# Altium PCB Sound_Sensor_v3.2.PcbDoc (part 1 of 3)
Units mil, origin at the board's own origin, x right, y up, seen from the top; angles counter-clockwise.
Board outline 2755.7 x 2687.13 mil, 2 copper layers (Top Layer, Bottom Layer), stack 57 mil thick; 77 components, 57 nets, 290 pads, 84 vias.
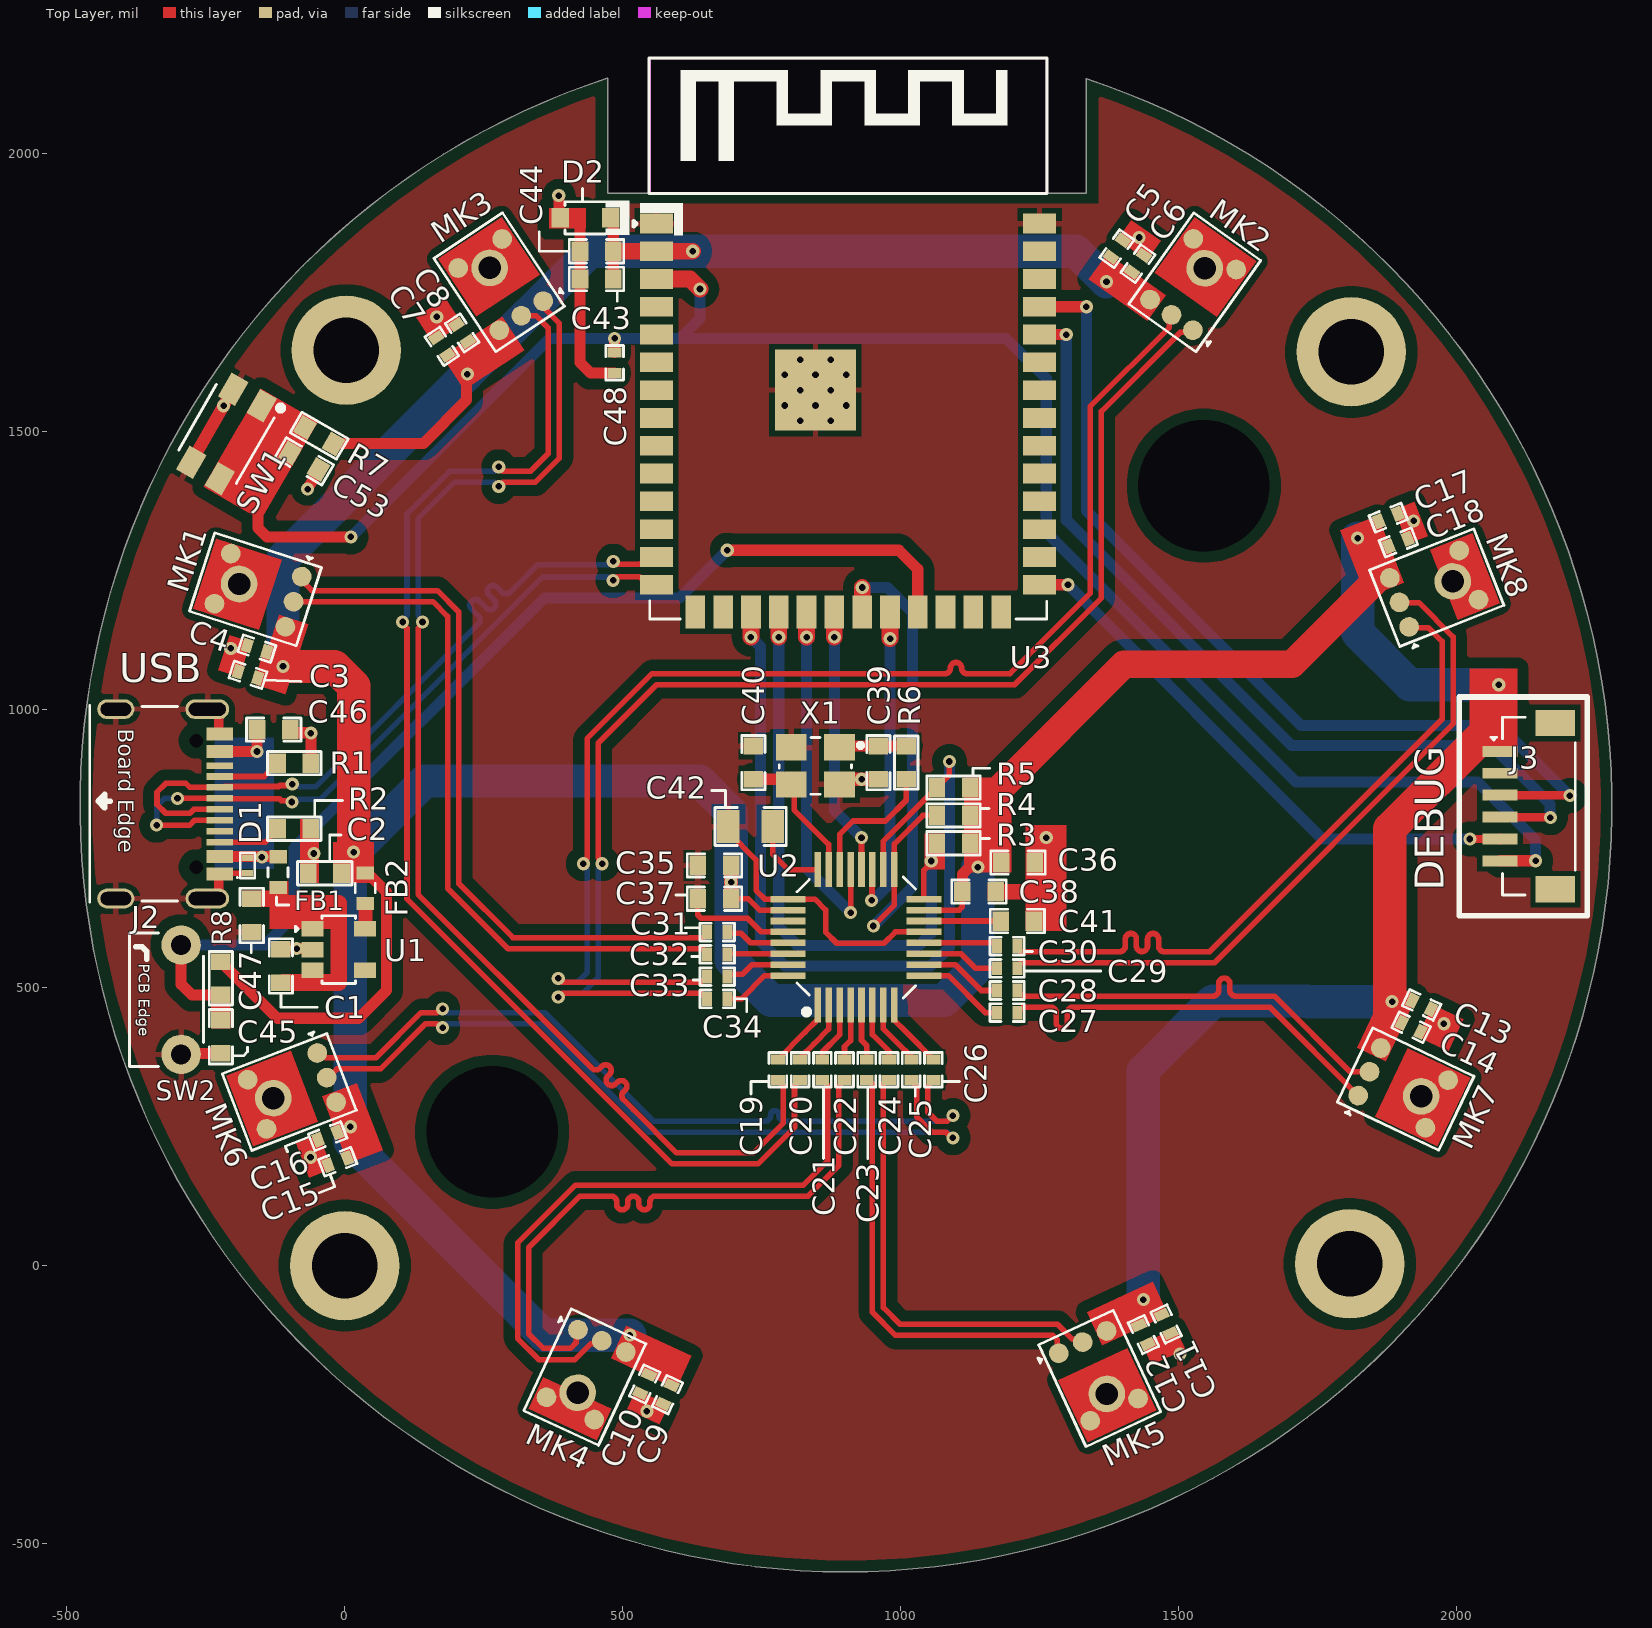
[diagram p0: Top Layer view]
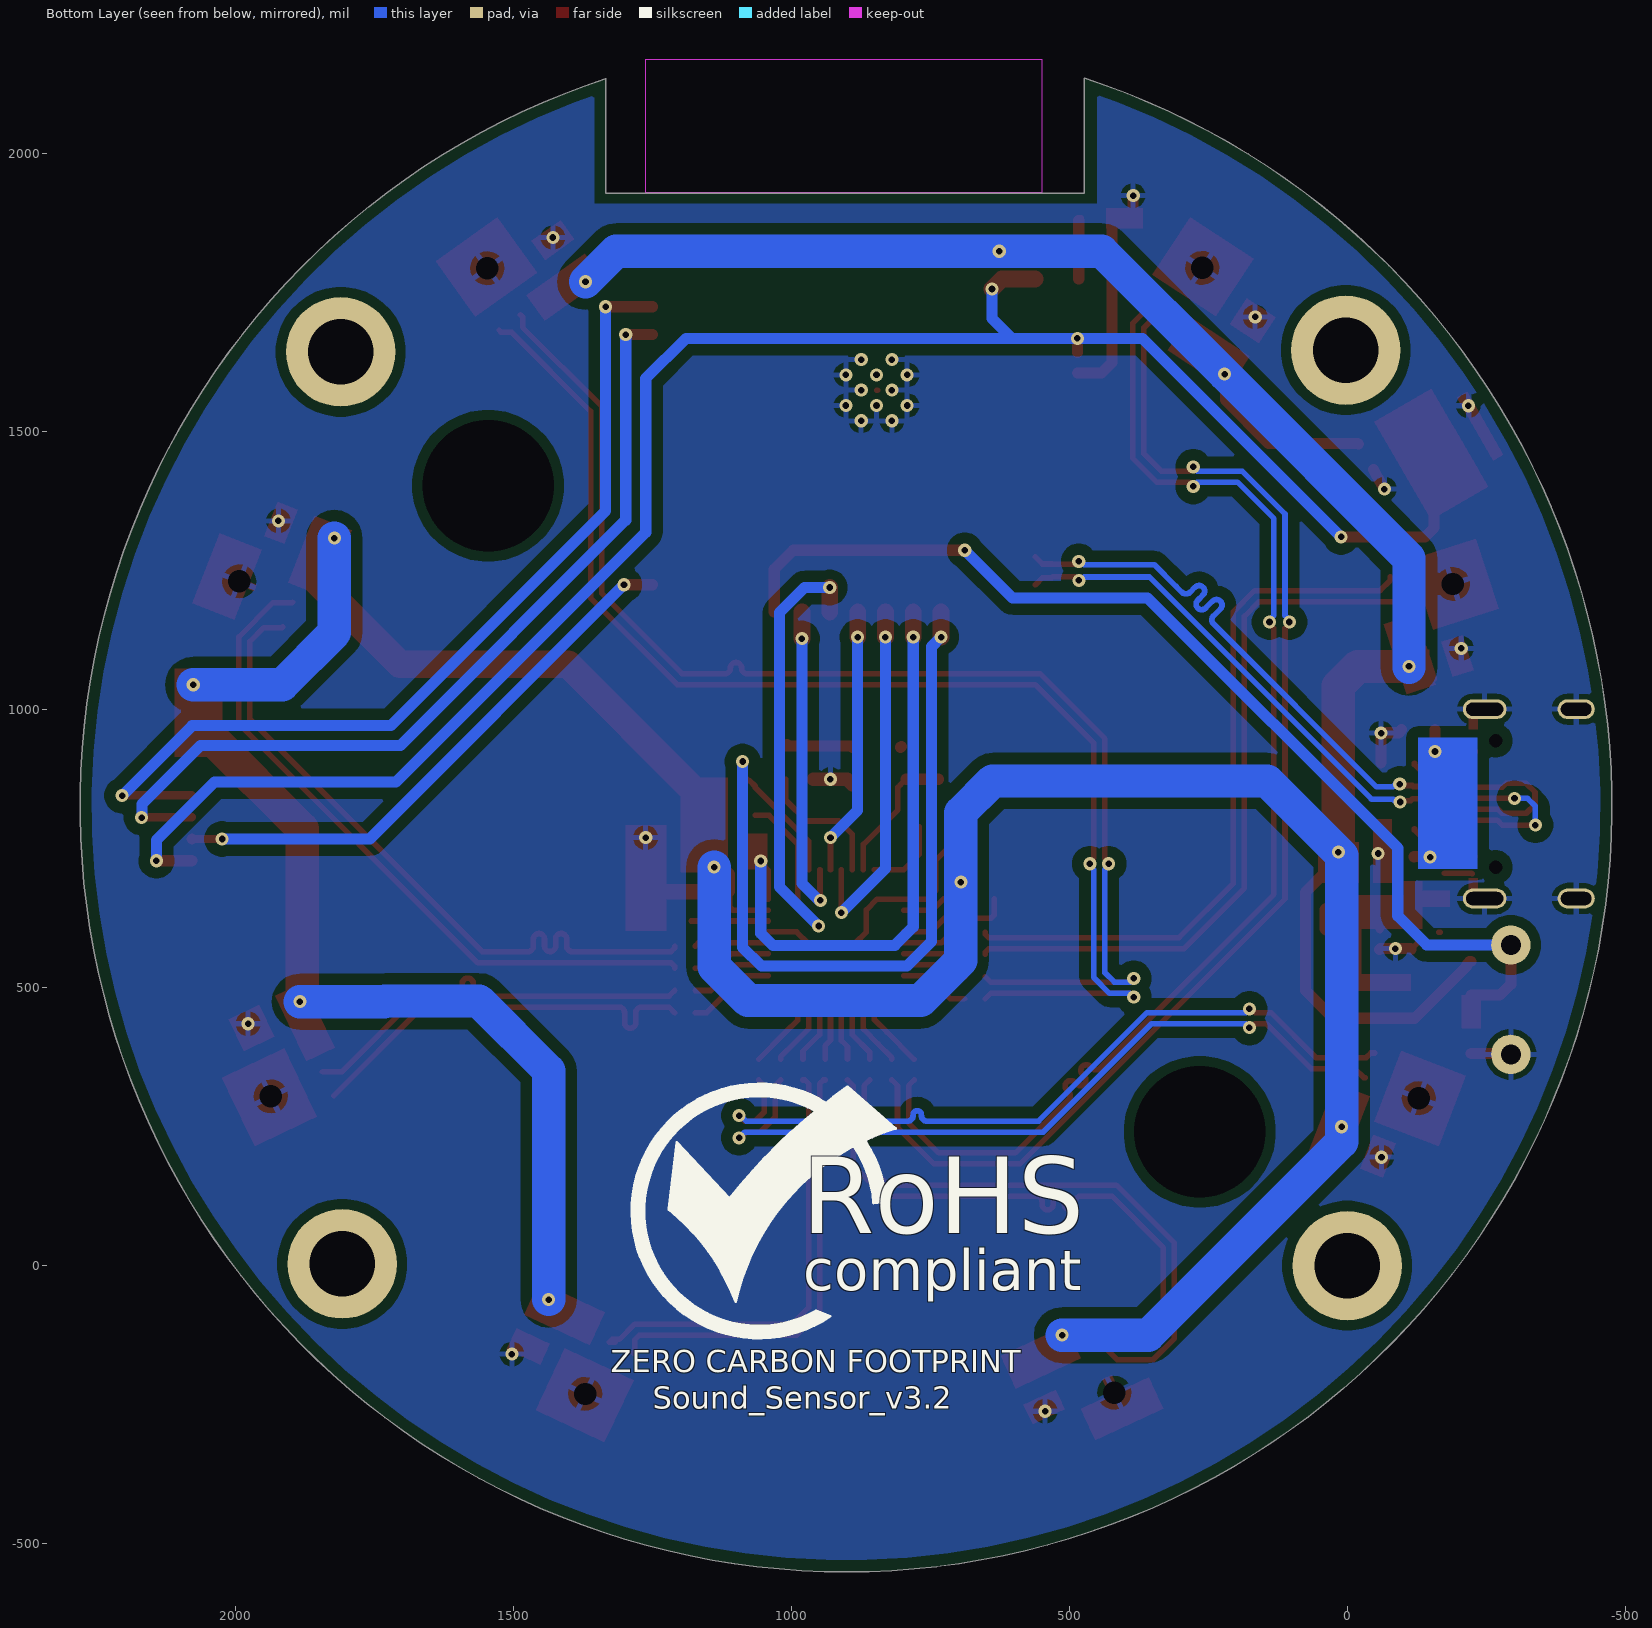
[diagram p1: Bottom Layer view, seen from below]

## Layer stack, top to bottom
Top Solder: solder mask 3, Solder Resist, Dk 3.5
Top Layer: signal copper 10
Dielectric 1: dielectric 37, FR-4, Dk 4.8
Bottom Layer: signal copper 10
Bottom Solder: solder mask 3, Solder Resist, Dk 3.5

## Board outline
471.79,2136.24 ccw(c901.69,827.06) 1334.24,2135.36 1334,2135.36 1334,1929.44 472.75,1929.44 472.75,2136.24

## Design rules (kind name [scope] priority, off if disabled: settings)
Clearance Clearance_TOP [OnLayer('Top Layer')] p1: gap=10 ignorepadtopadclearanceinfootprint=FALSE except(5: Arc-Arc Arc-Track Arc-SMDPad Track-Track Track-SMDPad SMDPad-SMDPad SMDPad-THPad SMDPad-Hole; 20: Arc-Fill Arc-Poly Arc-Region Track-Fill Track-Poly Track-Region THPad-Fill THPad-Poly THPad-Region Via-Fill Via-Poly Via-Region Fill-Fill Fill-Poly Fill-Region Poly-Poly Poly-Region Region-Region)
Clearance Clearance_BOT [OnLayer('Bottom Layer')] p2: gap=10 ignorepadtopadclearanceinfootprint=FALSE except(5: Arc-Arc Arc-Track Arc-SMDPad Track-Track Track-SMDPad SMDPad-SMDPad SMDPad-THPad SMDPad-Fill SMDPad-Poly SMDPad-Region SMDPad-Hole; 18: THPad-Fill THPad-Poly THPad-Region; 20: Arc-Fill Arc-Poly Arc-Region Track-Fill Track-Poly Track-Region Via-Fill Via-Poly Via-Region Fill-Fill Fill-Poly Fill-Region Poly-Poly Poly-Region Region-Region)
ComponentClearance [All] p1: gap=0 collisioncheckmode=3 verticalgap=0 showdistances=FALSE
DiffPairsRouting DiffPairsRouting_1 [InDifferentialPairClass('USB_Lines')] p1: maxlimit=12 minlimit=12 mostfreqgap=12 toplayer_minwidth=10 toplayer_maxwidth=10 toplayer_prefwidth=10 bottomlayer_minwidth=10 bottomlayer_maxwidth=10 bottomlayer_prefwidth=10 impedanceprofiledriven=TRUE impedanceprofileid={CC3068ED-7670-4747-8044-4FC642AA30B4} impedanceprofilevalue=90.000000 maxuncoupledlength=551
DiffPairsRouting [InDifferentialPairClass('All Differential Pairs')] p2: maxlimit=10 minlimit=10 mostfreqgap=10 toplayer_minwidth=10 toplayer_maxwidth=10 toplayer_prefwidth=10 bottomlayer_minwidth=10 bottomlayer_maxwidth=10 bottomlayer_prefwidth=10 impedanceprofiledriven=TRUE impedanceprofileid={4D369393-52E4-4E5C-B60A-CF207B47102A} impedanceprofilevalue=80.000000 maxuncoupledlength=500
HoleSize [All] p1: absolutevalues=TRUE maxlimit=500 minlimit=1 maxpercent=80.000 minpercent=20.000
MatchedLengths "Schematic Matched Net Lengths_2" [InNetClass('USB')] p1: tolerance=20 checknetsindiffpair=TRUE checkdiffpairvsdiffpair=FALSE checkxsignals=FALSE checkothers=FALSE
MatchedLengths "Schematic Matched Net Lengths" [InNetClass('OUT1')] p2: tolerance=20 checknetsindiffpair=TRUE checkdiffpairvsdiffpair=FALSE checkxsignals=FALSE checkothers=FALSE
MaxMinImpedance "Schematic Impedance Constraint_2" [InNetClass('USB')] p1: minimum=85.00 maximum=95.00
MaxMinImpedance "Schematic Impedance Constraint" [InNetClass('OUT1')] p2: minimum=85.00 maximum=95.00
MinimumSolderMaskSliver [All] p1: minsoldermaskwidth=0
PolygonConnect [All] p1: connectstyle=Relief reliefconductorwidth=10 reliefentries=4 polygonreliefangle="90 Angle" airgapwidth=10
RoutingVias [All] p1: holewidth=11.81 width=23.62 viastyle="Through Hole" minholewidth=11.81 minwidth=23.62 maxholewidth=11.81 maxwidth=23.62
SilkToSilkClearance [All] p1: silktosilkclearance=0
SilkToSolderMaskClearance [IsPad] p1: minsilkscreentomaskgap=0 clearancetoexposedcopper=TRUE
SolderMaskExpansion [All] p1: expansion=4 istentingtop=FALSE
Width [All] p1: maxlimit=100 minlimit=5 preferedwidth=10 toplayer_maxwidth=60 minimp=50.000000 maximp=50.000000 favimp=50.000000
24 further rules are at their usual default settings.

## Classes and differential pairs
differential pair class USB_Lines: USB.USB
net class USB: USB.USB_N USB.USB_P
differential pair class OUT8_Lines: MIC_OUTS.OUT8
differential pair class OUT7_Lines: MIC_OUTS.OUT7
differential pair class OUT6_Lines: MIC_OUTS.OUT6
differential pair class OUT5_Lines: MIC_OUTS.OUT5
differential pair class OUT4_Lines: MIC_OUTS.OUT4
differential pair class OUT3_Lines: MIC_OUTS.OUT3
differential pair class OUT2_Lines: MIC_OUTS.OUT2
differential pair class OUT1_Lines: MIC_OUTS.OUT1
net class OUT8: MIC_OUTS.OUT8_N MIC_OUTS.OUT8_P
net class OUT7: MIC_OUTS.OUT7_N MIC_OUTS.OUT7_P
net class OUT6: MIC_OUTS.OUT6_N MIC_OUTS.OUT6_P
net class OUT5: MIC_OUTS.OUT5_N MIC_OUTS.OUT5_P
net class OUT4: MIC_OUTS.OUT4_N MIC_OUTS.OUT4_P
net class OUT3: MIC_OUTS.OUT3_N MIC_OUTS.OUT3_P
net class OUT2: MIC_OUTS.OUT2_N MIC_OUTS.OUT2_P
net class OUT1: MIC_OUTS.OUT1_N MIC_OUTS.OUT1_P
component class U_Sensor_Sheet: C3 C4 C5 C6 C7 C8 C9 C10 C11 C12 C13 C14 C15 C16 C17 C18 MK1 MK2 MK3 MK4 MK5 MK6 MK7 MK8
component class U_Power_Section: C1 C2 FB2 U1
component class U_Controller_Sheet: C43 C44 C45 C48 C53 D2 R7 R8 SW1 SW2 U3
component class U_Connector_Sheet: C46 C47 D1 FB1 J2 J3 R1 R2
component class U_ADC_Section: 3 C19 C20 C21 C22 C23 C24 C25 C26 C27 C28 C29 C30 C31 C32 C33 C34 C35 C36 C37 C38 C39 c40 C41 C42 R3 R4 R5 R6 U2 X1
differential pair USB.USB: +USB.USB_P -USB.USB_N
differential pair MIC_OUTS.OUT8: +MIC_OUTS.OUT8_P -MIC_OUTS.OUT8_N
differential pair MIC_OUTS.OUT7: +MIC_OUTS.OUT7_P -MIC_OUTS.OUT7_N
differential pair MIC_OUTS.OUT6: +MIC_OUTS.OUT6_P -MIC_OUTS.OUT6_N
differential pair MIC_OUTS.OUT5: +MIC_OUTS.OUT5_P -MIC_OUTS.OUT5_N
differential pair MIC_OUTS.OUT4: +MIC_OUTS.OUT4_P -MIC_OUTS.OUT4_N
differential pair MIC_OUTS.OUT3: +MIC_OUTS.OUT3_P -MIC_OUTS.OUT3_N
differential pair MIC_OUTS.OUT2: +MIC_OUTS.OUT2_P -MIC_OUTS.OUT2_N
differential pair MIC_OUTS.OUT1: +MIC_OUTS.OUT1_P -MIC_OUTS.OUT1_N

## Components (designator, comment, footprint, x,y, rotation, side; value= is the part's Value field where it differs from the comment)
C1 "1uF" Cap-0603 -115,539 r90 top
C2 "4.7uF" Cap-0603 -36,706 r180 top
C3 "1uF" Cap-0402 -174.1,1063 r162 top
C4 "220pF" "Cap 0402" -158.1,1110 r162 top
C5 "1uF" Cap-0402 1388.94,1829.63 r54.5 top
C6 "220pF" "Cap 0402" 1426.94,1802.63 r54.5 top
C7 "1uF" Cap-0402 174.53,1653.94 r123.5 top
C8 "220pF" "Cap 0402" 211.13,1677.9 r123.5 top
C9 "1uF" Cap-0402 580.53,-231.94 r245 top
C10 "220pF" "Cap 0402" 539.53,-212.94 r245 top
C11 "1uF" Cap-0402 1477.63,-104.95 r295 top
C12 "220pF" "Cap 0402" 1436.63,-123.95 r295 top
C13 "1uF" Cap-0402 1937.22,469.06 r334.5 top
C14 "220pF" "Cap 0402" 1918.4,429.02 r334.5 top
C15 "1uF" Cap-0402 -12.73,187.1 r201 top
C16 "220pF" "Cap 0402" -30.73,233.1 r201 top
C17 "1uF" Cap-0402 1877.16,1345.79 r21.5 top
C18 "220pF" "Cap 0402" 1895.26,1301 r21.5 top
C19 "100nF" Cap-0402 779,352.5 r90 top
C20 "100nF" Cap-0402 819,352.5 r90 top
C21 "100nF" Cap-0402 859,352.5 r90 top
C22 "100nF" Cap-0402 899,352.5 r90 top
C23 "100nF" Cap-0402 939,352.5 r90 top
C24 "100nF" Cap-0402 979,352.5 r90 top
C25 "100nF" Cap-0402 1019,352.5 r90 top
C26 "100nF" Cap-0402 1059,352.5 r90 top
C27 "100nF" Cap-0402 1191.5,455 r180 top
C28 "100nF" Cap-0402 1191.5,495 r180 top
C29 "100nF" Cap-0402 1191.5,535 r180 top
C30 "100nF" Cap-0402 1191.5,575 r180 top
C31 "100nF" Cap-0402 670,600 r0 top
C32 "100nF" Cap-0402 670,560 r0 top
C33 "100nF" Cap-0402 670,520 r0 top
C34 "100nF" Cap-0402 670,480 r0 top
C35 "1uF" Cap-0603 665,720 r180 top
C36 "1uF" Cap-0603 1211,725 r0 top
C37 "100nF" Cap-0603 665,660 r180 top
C38 "100nF" Cap-0603 1141,673 r0 top
C39 "20pF" Cap-0603 960,905 r90 top
C40 "20pF" Cap-0603 735,905 r270 top
C41 "100nF" Cap-0603 1210,620 r0 top
C42 "220nF" Cap-0805 730,790 r0 top
C43 "1uF" Cap-0603 453,1775 r180 top
C44 "100nF" Cap-0603 453,1825 r180 top
C45 "100nF" Cap-0603 -223,412 r90 top
C46 "1uF" Cap-0603 -127.95,964.25 r0 top
C47 "1uF" Cap-0603 -167.32,629.92 r270 top
C48 "1uF" Cap-0402 485.5,1624.22 r90 top
C53 "100nF" Cap-0603 -73,1447 r330 top
D1 "TPD1E10B06DPYR" X1SON -175,720 r90 top
D2 "UDD32C03L01" SOD-323 433,1885 r180 top
FB1 "BLM18SG121TN1D" "IND-0603 (1608 Metric)" -120,708 r270 top
FB2 "BLM18SG121TN1D" "IND-0603 (1608 Metric)" 37,679 r90 top
J2 "TYPE-C-31-M-12" TYPE-C-31-M-12_ -224.87,956.76 r270 top locked
J3 "Voltlink Target" "Voltlink Target" 2127.98,826.77 r270 top locked
MK1 "SPM0687LR5H-1" SPM0687LR5H-1 -155.91,1215.24 r252 top
MK2 "SPM0687LR5H-1" SPM0687LR5H-1 1526.16,1765 r144.5 top
MK3 "SPM0687LR5H-1" SPM0687LR5H-1 280.51,1764.96 r213.5 top
MK4 "SPM0687LR5H-1" SPM0687LR5H-1 434.13,-196.05 r335 top
MK5 "SPM0687LR5H-1" SPM0687LR5H-1 1355.74,-198.25 r25 top
MK6 "SPM0687LR5H-1" SPM0687LR5H-1 -95.16,314.29 r291 top
MK7 "SPM0687LR5H-1" SPM0687LR5H-1 1903.94,319.92 r64.5 top
MK8 "SPM0687LR5H-1" SPM0687LR5H-1 1959.8,1217.8 r111.5 top
R1 "5.1K" Res-0603 -91,904 r180 top
R2 "5.1K" Res-0603 -91,786 r180 top
R3 "100K" RES-0603 1095,760 r0 top
R4 "100K" RES-0603 1095,810 r0 top
R5 "100K" RES-0603 1095,860 r0 top
R6 "0R" Res-0603 1010,905 r90 top
R7 "10K" Res-0603 -46,1493 r150 top
R8 "10K" Res-0603 -223,517 r90 top
SW1 "TS-1185EC-C-D-B" TS-1185EC-C-D-B -212.86,1496.21 r240 top
SW2 "K2-1101DF-C4DW-01" K2-1101DF-C4DW-01 -294.33,478.44 r270 top
U1 "XC6220B331MR-G" SOT-25-5 -10.75,568.58 r0 top locked
U2 "ADS131M08IPBSR" 32TQFP 919.68,590.55 r90 top locked
U3 "ESP32-S3-WROOM-1-N8R2" "41-SMD Module" 905.51,1525.39 r0 top locked
X1 "3TJ481920NYLBC" 3TJ481920NYLBC 846.69,899.06 r180 top

## Footprints (in the part's own frame and the unit in brackets; to place one, negate y for a bottom-side part, rotate by r counter-clockwise, add the part's x,y. Pads: shape width x height; smd on the part's side, far side on the other; paste and mask are expansions set on the pad)
3TJ481920NYLBC [mm]
  rect 1.4x1.2 smd mask+0.07: 1(-1.1,-0.85) 2(1.1,-0.85) 3(1.1,0.85) 4(-1.1,0.85)
  silkscreen extent -2.14,-1.3 1.65,1.3, body extent -1.6,-1.25 1.6,1.25, height 0.91
32TQFP [mm]
  rect 1.6x0.3 smd: 1(-3.1,1.75) 2(-3.1,1.25) 3(-3.1,0.75) 4(-3.1,0.25) 5(-3.1,-0.25) 6(-3.1,-0.75) 7(-3.1,-1.25) 8(-3.1,-1.75) 17(3.1,-1.75) 18(3.1,-1.25) 19(3.1,-0.75) 20(3.1,-0.25) 21(3.1,0.25) 22(3.1,0.75) 23(3.1,1.25) 24(3.1,1.75)
  rect 0.3x1.6 smd: 9(-1.75,-3.1) 10(-1.25,-3.1) 11(-0.75,-3.1) 12(-0.25,-3.1) 13(0.25,-3.1) 14(0.75,-3.1) 15(1.25,-3.1) 16(1.75,-3.1) 25(1.75,3.1) 26(1.25,3.1) 27(0.75,3.1) 28(0.25,3.1) 29(-0.25,3.1) 30(-0.75,3.1) 31(-1.25,3.1) 32(-1.75,3.1)
  silkscreen extent -3.53,-2.72 2.77,2.69, body extent -3.5,-3.51 3.5,3.49, height 1.25
"41-SMD Module" [mm]
  rect 1.5x0.9 smd: 1(-8.75,8.88) 2(-8.75,7.61) 3(-8.75,6.34) 4(-8.75,5.07) 5(-8.75,3.8) 6(-8.75,2.53) 7(-8.75,1.26) 8(-8.75,-0.01) 9(-8.75,-1.28) 10(-8.75,-2.55) 11(-8.75,-3.82) 12(-8.75,-5.09) 13(-8.75,-6.36) 14(-8.75,-7.63) 27(8.75,-7.63) 28(8.75,-6.36) 29(8.75,-5.09) 30(8.75,-3.82) 31(8.75,-2.55) 32(8.75,-1.28) 33(8.75,-0.01) 34(8.75,1.26) 35(8.75,2.53) 36(8.75,3.8) 37(8.75,5.07) 38(8.75,6.34) 39(8.75,7.61) 40(8.75,8.88)
  rect 0.9x1.5 smd: 15(-6.98,-8.88) 16(-5.71,-8.88) 17(-4.44,-8.88) 18(-3.17,-8.88) 19(-1.9,-8.88) 20(-0.63,-8.88) 21(0.64,-8.88) 22(1.91,-8.88) 23(3.18,-8.88) 24(4.45,-8.88) 25(5.72,-8.88) 26(6.99,-8.88)
  rect 3.7x3.7 smd: 41(-1.5,1.26)
  Keep-Out Layer region: -9.042,10.287 9.042,10.287 9.042,16.383 -9.042,16.383
  silkscreen extent -9.8,-9.2 9.09,16.43, body extent -9.01,-9.14 9.01,16.37, height 3.16
"Cap 0402" [mil]
  rect 18x25 smd mask+2.36: 1(-18.5,0) 2(18.5,0)
  silkscreen extent -31,-16 31,16, body extent -20,-10 20,10, height 19
Cap-0402 [mil]
  rect 18x25 smd mask+2.36: 1(-18.5,0) 2(18.5,0)
  silkscreen extent -31,-16 31,16, body extent -20,-10 20,10, height 19
Cap-0603 [mil]
  rect 30x35 smd mask+2.36: 1(-30,0) 2(30,0)
  silkscreen extent -49,-21 49,21, body extent -32,-16 31,16, height 34
Cap-0805 [mil] "SMD 0805"
  rect 40x60 smd mask+2.76: 1(-40,0) 2(40,0)
  silkscreen extent -64,-34 64,34, body extent -39,-25 39,25, height 30
"IND-0603 (1608 Metric)" [mm] "0.063\" L x 0.032\" W (1.60mm x 0.80mm)"
  rect 0.6x0.8 smd: 1(-0.7,0) 2(0.7,0)
  silkscreen extent -0.2,-0.46 0.23,0.46, body extent -0.8,-0.4 0.8,0.4, height 0.78
K2-1101DF-C4DW-01 [mm]
  round 1.8 hole 0.92: 1(-2.5,0) 2(2.5,0)
  silkscreen extent -3.05,-2.36 3.05,1.02, body extent -3,-4.04 3,0.96, height 3.45
Res-0603 [mil]
  rect 30x35 smd: 1(-30,0) 2(30,0)
  silkscreen extent -48,-21 48,21, body extent -31,-17 31,17, height 18
RES-0603 [mil]
  rect 30x35 smd: 1(-30,0) 2(30,0)
  silkscreen extent -48,-21 48,21, body extent -31,-17 31,17, height 18
SOD-323 [mm]
  rect 0.8x0.9 smd mask+0.055: 1(-1.15,0) 2(1.15,0)
  silkscreen extent -2.01,-0.79 0.94,0.79, body extent -1.3,-0.67 1.3,0.67, height 1.1
SOT-25-5 [mm]
  rect 1x0.7 smd: 1(-1.2,0.95) 2(-1.2,0) 3(-1.2,-0.95) 4(1.2,-0.95) 5(1.2,0.95)
  silkscreen extent -1.98,-1.55 0.76,1.55, body extent -1.19,-1.5 1.21,1.5, height 1.1
SPM0687LR5H-1 [mm]
  round 0.9 smd: 1(-1.204,1.703) 2(-1.204,-1.703) 4(1.204,-1.703) 5(1.204,1.703) 6(0,1.703)
  round 1.676 / inner round 1.676 / far side round 0 hole 1.025: 3(0,-0.913)
  silkscreen extent -2.16,-2.69 1.88,2.44, body extent -1.88,-2.68 1.88,2.38, height 1.15
TS-1185EC-C-D-B [mm]
  rect 1.25x0.9 smd: 1(-1.925,0.75) 1(1.925,0.75) 2(-1.925,-0.75) 2(1.925,-0.75)
  silkscreen extent -2.39,-1.52 1.73,1.68, body extent -2.33,-1.5 2.32,1.5, height 2
TYPE-C-31-M-12_ [mm]
  rect 0.6x1.2 smd: A1/B12(0,0) A4/B9(0.8,0) B1/A12(6.4,0) B4/A9(5.6,0)
  rect 0.3x1.2 smd: A5(1.95,0) A6(2.95,0) A7(3.45,0) A8(4.45,0) B5(4.95,0) B6(3.95,0) B7(2.45,0) B8(1.45,0)
  round 0 hole 0.62 unplated: MH(0.31,-1.07) MH(6.09,-1.07)
  oval 0.9x2 hole 0.6 slot 1.7 at 90 deg: S1(7.525,-0.57) S4(-1.125,-0.57)
  oval 0.9x1.7 hole 0.6 slot 1.4 at 90 deg: S2(7.525,-4.75) S3(-1.125,-4.75)
  silkscreen extent -1.3,-5.94 7.7,-1.93, body extent -1.27,-7.32 7.67,0.58, height 3.31
"Voltlink Target" [mm]
  rect 0.5x1.6 smd: 1(-2.5,-1.262) 2(-1.5,-1.262) 3(-0.5,-1.262) 4(0.5,-1.262) 5(1.5,-1.262) 6(2.5,-1.262)
  rect 1.2x1.8 smd: MP1(-3.8,1.262) MP2(3.8,1.262)
  silkscreen extent -4.06,-1.68 4.06,2.17, body extent -4,-1.49 4,2.11, height 4.25
X1SON [mm] "TVS 6A@80/20µs 14V 6V 5.5V@(MAX)"
  rect 0.3x0.5 smd: 1(-0.35,0) 2(0.35,0)
  silkscreen extent -0.58,-0.33 0.58,0.47, body extent -0.5,-0.3 0.5,0.3, height 0.45

## Part data
C1 C35 C36 C43 C46 C47: library part CC0603KRX5R8BB105, "CAP CER 1UF 25V X5R 0603", Case Code (Imperial)=0603, Case Code (Metric)=1608, Dielectric=X5R, LCSC Part Number=C14664, Manufacturer=Yageo, Max Operating Temperature=85°C, Min Operating Temperature=-55°C, Package Quantity=1, Supplier Part Number 1=311-1445-1-ND, Tolerance=10%, Voltage Rating=25V, Capacitance=1uF, Case/Package=0603, Category="Ceramic Capacitors", ComponentLink1Description=https://datasheet.ciiva.com/176/mlccorderingcode-176785.pdf?src-supplier=Digi-Key, ComponentLink1URL=https://datasheet.ciiva.com/176/mlccorderingcode-176785.pdf?src-supplier=Digi-Key, ComponentLink2Description=https://datasheet.ciiva.com/176/mlccorderingcode-176786.pdf?src-supplier=Digi-Key, ComponentLink2URL=https://datasheet.ciiva.com/176/mlccorderingcode-176786.pdf?src-supplier=Digi-Key, ComponentLink3Description=https://datasheet.ciiva.com/176/mlccorderingcode-176787.pdf?src-supplier=Digi-Key, ComponentLink3URL=https://datasheet.ciiva.com/176/mlccorderingcode-176787.pdf?src-supplier=Digi-Key, ComponentLink4Description=https://datasheet.ciiva.com/17436/upy-gphc-x5r-4v-to-50v-12-17436952.pdf?src-supplier=Avnet+Europe, ComponentLink4URL=https://datasheet.ciiva.com/17436/upy-gphc-x5r-4v-to-50v-12-17436952.pdf?src-supplier=Avnet+Europe, ComponentLink5Description=https://datasheet.ciiva.com/7978/1525783-7978171.pdf?src-supplier=Element14, ComponentLink5URL=https://datasheet.ciiva.com/7978/1525783-7978171.pdf?src-supplier=Element14, ComponentLink6Description=https://datasheet.ciiva.com/11586/upy-gphc-x5r-4v-to-50v-12-11586318.pdf?src-supplier=Avnet, ComponentLink6URL=https://datasheet.ciiva.com/11586/upy-gphc-x5r-4v-to-50v-12-11586318.pdf?src-supplier=Avnet, Construction=Flat, Depth=0.8mm, Halogen Free="Halogen Free", Height=0.8mm, Item Type=Capacitor, Lead Free="Lead Free", Length=1.6mm, Manufacturer Part Number=CC0603KRX5R8BB105, Mount="Surface Mount", Number of Pins=2, Packaging="Tape and Reel", Pricing 1="1=0.12000, 10=0.08400, 50=0.04760, 100=0.03940, 500=0.02764, 1000=0.02288 (USD)", Radiation Hardening=No, REACH SVHC="No SVHC", RoHS=Yes, RoHS Compliant=Yes, Series=CC, Stock 1=919939, Supplier 1=Digi-Key, Termination=SMD/SMT, Thickness=0.035inch, Voltage Rating (DC)=25V, Width=0.031inch
C2: library part CC0603KRX5R7BB475, "CAP CER 4.7UF 16V X5R 0603", Case Code (Imperial)=0603, Case Code (Metric)=1608, Dielectric=X5R, LCSC Part Number=C277476, Manufacturer=Yageo, Max Operating Temperature=85°C, Min Operating Temperature=-55°C, Resistor Type=Ceramic, Supplier Part Number 1=311-1785-1-ND, Tolerance=10%, Voltage Rating=16V, Capacitance=4.7uF, Case/Package=0603, Category="Ceramic Capacitors", ComponentLink1Description=http://www.mouser.com/ds/2/447/UPY-GPHC_X5R_4V-to-50V_25-1131599.pdf?src-supplier=Mouser, ComponentLink1URL=http://www.mouser.com/ds/2/447/UPY-GPHC_X5R_4V-to-50V_25-1131599.pdf?src-supplier=Mouser, ComponentLink2Description=http://www.yageo.com/documents/recent/UPY-GPHC_X5R_4V-to-50V_25.pdf?src-supplier=Digi-Key, ComponentLink2URL=http://www.yageo.com/documents/recent/UPY-GPHC_X5R_4V-to-50V_25.pdf?src-supplier=Digi-Key, Depth=0.8mm, Halogen Free="Halogen Free", Height=0.8mm, Lead Free="Lead Free", Length=1.6mm, Manufacturer Part Number=CC0603KRX5R7BB475, Mount="Surface Mount", Packaging="Tape and Reel", Pricing 1="1=0.20000, 10=0.13800, 50=0.08280, 100=0.06990, 500=0.04784, 1000=0.04233 (USD)", RoHS=Yes, RoHS Compliant=Yes, Series=CC, Stock 1=547703, Supplier 1=Digi-Key, Termination=SMD/SMT, Thickness=0.037inch, Voltage Rating (DC)=16V, Weight=7.1E-05oz, Width=0.8mm
C3 C5 C7 C9 C11 C13 C15 C17 C48: library part CC0402KRX5R8BB105, "CAP CER 1UF 25V X5R 0402", Case Code (Imperial)=0402, Case Code (Metric)=1005, Dielectric=X5R, LCSC Part Number=C326568, Manufacturer=Yageo, Max Operating Temperature=85°C, Min Operating Temperature=-55°C, Package Quantity=10000, Supplier Part Number 1=603-CC402KRX5R8BB105, Tolerance=10%, Voltage Rating=25V, Capacitance=1uF, Case/Package=0402, Category="Ceramic Capacitors", ComponentLink1Description=http://www.mouser.com/ds/2/447/Yageo_UPY-GP_NP0_16V-to-50V_9-358835.pdf?src-supplier=Mouser, ComponentLink1URL=http://www.mouser.com/ds/2/447/Yageo_UPY-GP_NP0_16V-to-50V_9-358835.pdf?src-supplier=Mouser, ComponentLink2Description=http://www.yageo.com/documents/recent/UPY-GPHC_X5R_4V-to-50V_25.pdf?src-supplier=Digi-Key, ComponentLink2URL=http://www.yageo.com/documents/recent/UPY-GPHC_X5R_4V-to-50V_25.pdf?src-supplier=Digi-Key, ComponentLink3Description=https://4donline.ihs.com/images/VipMasterIC/IC/YAGO/YAGO-S-A0006851646/YAGO-S-A0006851646-1.pdf?hkey=6D3A4C79FDBF58556ACFDE234799DDF0&src-supplier=Newark, ComponentLink3URL=https://4donline.ihs.com/images/VipMasterIC/IC/YAGO/YAGO-S-A0006851646/YAGO-S-A0006851646-1.pdf?hkey=6D3A4C79FDBF58556ACFDE234799DDF0&src-supplier=Newark, Halogen Free="Halogen Free", Lead Free="Lead Free", Length=0.039inch, Manufacturer Part Number=CC0402KRX5R8BB105, Mount="Surface Mount", Packaging="Tape and Reel", Pricing 1="1=0.30000, 10=0.20400, 50=0.20400, 100=0.11600, 1000=0.07200, 10000=0.05900 (USD)", RoHS=Yes, RoHS Compliant=Yes, Stock 1=91975, Supplier 1=Mouser, Termination=SMD/SMT, Thickness=0.022inch, Voltage Rating (DC)=25V, Weight=2.3E-05oz, Width=0.02inch
C4 C6 C8 C10 C12 C14 C16 C18: library part CC0402JRNPO9BN221, "CAP CER 220PF 50V C0G/NPO 0402", Case Code (Imperial)=0402, Case Code (Metric)=1005, Dielectric=C0G, Dielectric Material=Ceramic, Insulation Resistance=10GR, Manufacturer=Yageo, Max Operating Temperature=125°C, Min Operating Temperature=-55°C, Package Quantity=1, Supplier Part Number 1=6169284, Temperature Coefficient=30ppm/°C, Tolerance=10%, Voltage=50V, Capacitance=220pF, Case/Package=0402, Category="Ceramic Capacitors", ComponentLink1Description=https://datasheet.ciiva.com/11786/0900766b8079c870-11786154.pdf?src-supplier=RSComponents, ComponentLink1URL=https://datasheet.ciiva.com/11786/0900766b8079c870-11786154.pdf?src-supplier=RSComponents, ComponentLink2Description=https://datasheet.ciiva.com/7656/1132289-7656616.pdf?src-supplier=Element14, ComponentLink2URL=https://datasheet.ciiva.com/7656/1132289-7656616.pdf?src-supplier=Element14, ComponentLink3Description=https://datasheet.ciiva.com/8033/1443161-8033609.pdf?src-supplier=Element14, ComponentLink3URL=https://datasheet.ciiva.com/8033/1443161-8033609.pdf?src-supplier=Element14, ComponentLink4Description=https://datasheet.ciiva.com/8033/1443161-8033608.pdf?src-supplier=Element14, ComponentLink4URL=https://datasheet.ciiva.com/8033/1443161-8033608.pdf?src-supplier=Element14, ComponentLink5Description=https://datasheet.ciiva.com/176/mlccorderingcode-176384.pdf?src-supplier=Digi-Key, ComponentLink5URL=https://datasheet.ciiva.com/176/mlccorderingcode-176384.pdf?src-supplier=Digi-Key, ComponentLink6Description=https://datasheet.ciiva.com/176/mlccorderingcode-176383.pdf?src-supplier=Digi-Key, ComponentLink6URL=https://datasheet.ciiva.com/176/mlccorderingcode-176383.pdf?src-supplier=Digi-Key, ComponentLink7Description=https://datasheet.ciiva.com/176/mlccorderingcode-176385.pdf?src-supplier=Digi-Key, ComponentLink7URL=https://datasheet.ciiva.com/176/mlccorderingcode-176385.pdf?src-supplier=Digi-Key, ComponentLink8Description=https://datasheet.ciiva.com/17434/upy-gp-np0-16v-to-50v-8-17434343.pdf?src-supplier=Avnet+Europe, ComponentLink8URL=https://datasheet.ciiva.com/17434/upy-gp-np0-16v-to-50v-8-17434343.pdf?src-supplier=Avnet+Europe, Depth=0.5mm, Dissipation Factor=0.1%, Height=0.5mm, Lead Free="Lead Free", Length=1mm, Manufacturer Part Number=CC0402JRNPO9BN221, Mount="Surface Mount", Number of Pins=2, Packaging="Tape and Reel", Pricing 1="10000=0.00600, 100000=0.00600 (GBP)", Radiation Hardening=No, REACH SVHC="No SVHC", RoHS=Yes, RoHS Compliant=Yes, Series=CC, Stock 1=20000, Supplier 1=RSComponents, Termination=SMD/SMT, Thickness=0.022inch, Voltage Rating=50V, Width=0.02inch
C19 C20 C21 C22 C23 C24 C25 C26 C27 C28 C29 C30 C31 C32 C33 C34: library part CC0402KRX5R7BB104, "CAP CER 0.1UF 16V X5R 0402", Case Code (Imperial)=0402, Case Code (Metric)=1005, Dielectric=X5R, LCSC Part Number=C106204, Manufacturer=Yageo, Max Operating Temperature=85°C, Min Operating Temperature=-55°C, Package Quantity=1, Resistor Type=Ceramic, Supplier Part Number 1=603-CC402KRX5R7BB104, Tolerance=10%, Voltage Rating=16V, Capacitance=100nF, Case/Package=0402, Category="Ceramic Capacitors", ComponentLink1Description=https://datasheet.ciiva.com/155/mlccorderingcode-155879.pdf?src-supplier=Digi-Key, ComponentLink1URL=https://datasheet.ciiva.com/155/mlccorderingcode-155879.pdf?src-supplier=Digi-Key, ComponentLink2Description=https://datasheet.ciiva.com/155/mlccorderingcode-155878.pdf?src-supplier=Digi-Key, ComponentLink2URL=https://datasheet.ciiva.com/155/mlccorderingcode-155878.pdf?src-supplier=Digi-Key, ComponentLink3Description=https://datasheet.ciiva.com/155/mlccorderingcode-155880.pdf?src-supplier=Digi-Key, ComponentLink3URL=https://datasheet.ciiva.com/155/mlccorderingcode-155880.pdf?src-supplier=Digi-Key, ComponentLink4Description=https://datasheet.ciiva.com/11464/upy-gphc-x5r-4v-to-50v-12-11464869.pdf?src-supplier=Avnet, ComponentLink4URL=https://datasheet.ciiva.com/11464/upy-gphc-x5r-4v-to-50v-12-11464869.pdf?src-supplier=Avnet, Construction=Flat, Depth=0.5mm, Halogen Free="Halogen Free", Height=0.5mm, Lead Free="Lead Free", Length=1mm, Manufacturer Part Number=CC0402KRX5R7BB104, Mount="Surface Mount", Number of Pins=2, Packaging="Tape and Reel", Pricing 1="1=0.10000, 10=0.02300, 50=0.02300, 100=0.01100, 1000=0.00600, 10000=0.00400 (USD)", Radiation Hardening=No, REACH SVHC=Unknown, RoHS=Yes, RoHS Compliant=Yes, Series=CC, Stock 1=936792, Supplier 1=Mouser, Termination=SMD/SMT, Thickness=0.022inch, Voltage Rating (DC)=16V, Width=0.02inch
C37 C38 C41 C44 C45 C53: library part CC0603KRX5R9BB104, "CAP CER 0.1UF 50V X5R 0603", Case Code (Imperial)=0603, Case Code (Metric)=1608, Dielectric=X5R, LCSC Part Number=C110022, Manufacturer=Yageo, Max Operating Temperature=85°C, Min Operating Temperature=-55°C, Package Quantity=4000, Supplier Part Number 1=311-4046-1-ND, Tolerance=10%, Voltage Rating=50V, Capacitance=100nF, Case/Package=0603, Category="Ceramic Capacitors", ComponentLink1Description=http://www.mouser.com/ds/2/447/Yageo_UPY-GP_NP0_16V-to-50V_9-358835.pdf?src-supplier=Mouser, ComponentLink1URL=http://www.mouser.com/ds/2/447/Yageo_UPY-GP_NP0_16V-to-50V_9-358835.pdf?src-supplier=Mouser, ComponentLink2Description=https://www.yageo.com/upload/media/product/productsearch/datasheet/mlcc/UPY-GPHC_X5R_4V-to-50V_26.pdf?src-supplier=Digi-Key, ComponentLink2URL=https://www.yageo.com/upload/media/product/productsearch/datasheet/mlcc/UPY-GPHC_X5R_4V-to-50V_26.pdf?src-supplier=Digi-Key, ComponentLink3Description=http://www.yageo.com/exep/pages/download/literatures/ProductSelectionGuide%202014_Final_2.pdf?src-supplier=Digi-Key, ComponentLink3URL=http://www.yageo.com/exep/pages/download/literatures/ProductSelectionGuide%202014_Final_2.pdf?src-supplier=Digi-Key, Halogen Free="Halogen Free", Item Type=Capacitor, Lead Free="Lead Free", Length=0.063inch, Manufacturer Part Number=CC0603KRX5R9BB104, Mount="Surface Mount", Packaging="Tape and Reel", Pricing 1="1=0.10000, 10=0.05200, 50=0.02820, 100=0.02310, 500=0.01648, 1000=0.01294 (USD)", RoHS=Yes, Stock 1=152253, Supplier 1=Digi-Key, Termination=SMD/SMT, Thickness=0.035inch, Voltage Rating (DC)=50V, Weight=7.1E-05oz, Width=0.031inch
C39 C40: library part CC0603JRNPO9BN200, "CAP CER 20PF 50V C0G/NPO 0603", Case Code (Imperial)=0603, Case Code (Metric)=1608, Dielectric=C0G, LCSC Part Number=C105621, Manufacturer=Yageo, Max Operating Temperature=125°C, Min Operating Temperature=-55°C, Package Quantity=4000, Supplier Part Number 1=311-1424-6-ND, Tolerance=5%, Voltage Rating=50V, Capacitance=20pF, Case/Package=0603, ComponentLink1Description=http://www.farnell.com/datasheets/1132289.pdf?src-supplier=Element14, ComponentLink1URL=http://www.farnell.com/datasheets/1132289.pdf?src-supplier=Element14, ComponentLink2Description=http://www.yageo.com/documents/recent/UPY-GP_NP0_16V-to-50V_16.pdf?src-supplier=Digi-Key, ComponentLink2URL=http://www.yageo.com/documents/recent/UPY-GP_NP0_16V-to-50V_16.pdf?src-supplier=Digi-Key, Composition=Ceramic, Depth=0.8mm, Item Type=Capacitor, Lead Free="Lead Free", Length=1.6mm, Manufacturer Part Number=CC0603JRNPO9BN200, Mount="Surface Mount", Number of Pins=2, Packaging="Tape and Reel", Pricing 1="1=0.1, 10=0.048, 100=0.0214, 500=0.01526, 1000=0.01198 (USD)", REACH SVHC=Unknown, Stock 1=259568, Supplier 1=Digi-Key, Termination=SMD/SMT, Thickness=0.035inch, Voltage Rating (DC)=50V, Weight=7.1E-05oz, Width=0.8mm
C42: library part 08051C224K4T2A, "CAP CER 0.22UF 100V X7R 0805", Case/Package=0805, Dielectric=X7R, LCSC Part Number=C2176107, Manufacturer="Kyocera AVX", Max Operating Temperature=125°C, Min Operating Temperature=-55°C, Supplier Part Number 1=478-13049-1-ND, Tolerance=10%, Voltage Rating (DC)=100V, Capacitance=220nF, Category="Ceramic Capacitors", ComponentLink1Description=http://datasheets.avx.com/AutoMLCC.pdf?src-supplier=Avnet+Asia, ComponentLink1URL=http://datasheets.avx.com/AutoMLCC.pdf?src-supplier=Avnet+Asia, Contact Plating=Tin, Item Type=Capacitor, Length=2.01mm, Manufacturer Part Number=08051C224K4T2A, Mount="Surface Mount", Pricing 1="1=0.27000, 10=0.18500, 50=0.12320, 100=0.10470, 500=0.07392, 1000=0.06468 (USD)", RoHS=Yes, RoHS Compliant=Yes, Stock 1=151, Supplier 1=Digi-Key, Termination=Wraparound
D1: "DIODE TVS SMD 5.5V 5A 90W", Breakdown Voltage=6V, Capacitance=12pF, Case/Package=SON, Clamping Voltage=14V, Leakage Current=100nA, Manufacturer="Texas Instruments", Max Operating Temperature=125°C, Min Operating Temperature=-40°C, Package Quantity=1, Peak Pulse Current=5A, Peak Pulse Power=90W, Power Line Protection=No, Resistor Type=Zener, Reverse Standoff Voltage=5.5V, Supplier Part Number 1=595-TPD1E10B06DPYR, Test Current=1mA, Category="TVS Diodes", ComponentLink1Description=https://datasheet.ciiva.com/22691/1877100-22691786.pdf?src-supplier=Element14, ComponentLink1URL=https://datasheet.ciiva.com/22691/1877100-22691786.pdf?src-supplier=Element14, ComponentLink2Description=https://datasheet.ciiva.com/46384/1877100-46384054.pdf?src-supplier=Element14, ComponentLink2URL=https://datasheet.ciiva.com/46384/1877100-46384054.pdf?src-supplier=Element14, ComponentLink3Description=https://datasheet.ciiva.com/2961/tpd1e10b06-2961245.pdf?src-supplier=Digi-Key, ComponentLink3URL=https://datasheet.ciiva.com/2961/tpd1e10b06-2961245.pdf?src-supplier=Digi-Key, ComponentLink4Description=https://datasheet.ciiva.com/6574/tpd1e10b06-6574654.pdf?src-supplier=Digi-Key, ComponentLink4URL=https://datasheet.ciiva.com/6574/tpd1e10b06-6574654.pdf?src-supplier=Digi-Key, ComponentLink5Description=https://datasheet.ciiva.com/2961/tpd1e10b06-2961246.pdf?src-supplier=Digi-Key, ComponentLink5URL=https://datasheet.ciiva.com/2961/tpd1e10b06-2961246.pdf?src-supplier=Digi-Key, ComponentLink6Description=https://datasheet.ciiva.com/14195/tpd1e10b06-14195178.pdf?src-supplier=Avnet, ComponentLink6URL=https://datasheet.ciiva.com/14195/tpd1e10b06-14195178.pdf?src-supplier=Avnet, Contact Plating=Gold, Diode Type=ZENER, Direction=Bidirectional, Element Configuration=Single, ESD Protection=Yes, Height=0.35mm, Interface=GPIO, Lead Free="Lead Free", Length=1.1mm, Manufacturer Part Number=TPD1E10B06DPYR, Max Reverse Leakage Current=100nA, Min Breakdown Voltage=6V, Number of Bidirectional Channels=1, Number of Channels=1, Number of Pins=2, Packaging="Tape and Reel", Pricing 1="1=0.39000, 10=0.29800, 50=0.29800, 100=0.18600, 500=0.12700, 1000=0.09800, 2500=0.08300, 10000=0.07500 (USD)", Radiation Hardening=No, REACH SVHC="No SVHC", RoHS=Yes, RoHS Compliant=Yes, Series=-, Supplier 1=Mouser, Width=0.7mm, Working Voltage=5.5V
D2: "15V 19A 3.3V 4V Bidirectional SOD-323 ESD Protection Devices ROHS", LCSC Part Number=C78439, Manufacturer=Brightking, ComponentLink1Description=LCSC, ComponentLink1URL=https://lcsc.com/product-detail/span-style-background-color-ff0-ESD-span-Protection-Devices_Brightking-Elec-TAIWAN-UDD32C03L01_C78439.html, Item Type="ESD Diode", Manufacturer Part Number=UDD32C03L01
FB1 FB2: "FERRITE BEAD 120 OHM 0603 1LN", Case Code (Imperial)=0603, Case Code (Metric)=1608, Current Rating=3A, DC Resistance (DCR)=25mR, Frequency=100MHz, LCSC Part Number=C113030, Manufacturer=Murata, Max Operating Temperature=125°C, Min Operating Temperature=-55°C, Package Quantity=1, Tolerance=25%, Case/Package=0603, Category="Ferrite Beads and Chips", ComponentLink1Description=https://datasheet.ciiva.com/1012/l0110s0100blm18s-1012624.pdf?src-supplier=Digi-Key, ComponentLink1URL=https://datasheet.ciiva.com/1012/l0110s0100blm18s-1012624.pdf?src-supplier=Digi-Key, ComponentLink2Description=https://datasheet.ciiva.com/11799/0900766b811b5866-11799181.pdf?src-supplier=RSComponents, ComponentLink2URL=https://datasheet.ciiva.com/11799/0900766b811b5866-11799181.pdf?src-supplier=RSComponents, ComponentLink3Description=https://datasheet.ciiva.com/18093/getdatasheetpartid-295885-18093249.pdf?src-supplier=Verical, ComponentLink3URL=https://datasheet.ciiva.com/18093/getdatasheetpartid-295885-18093249.pdf?src-supplier=Verical, ComponentLink4Description=https://datasheet.ciiva.com/41449/001171723-da-01-en-chip-drossel0603-120r-3000ma-1-6x0-8mm-41449353.pdf?src-supplier=Conrad, ComponentLink4URL=https://datasheet.ciiva.com/41449/001171723-da-01-en-chip-drossel0603-120r-3000ma-1-6x0-8mm-41449353.pdf?src-supplier=Conrad, ComponentLink5Description=https://datasheet.ciiva.com/41449/001172312-da-01-en-drossel-0603-120r-1-6x0-8mm-10000st-41449675.pdf?src-supplier=Conrad, ComponentLink5URL=https://datasheet.ciiva.com/41449/001172312-da-01-en-drossel-0603-120r-1-6x0-8mm-10000st-41449675.pdf?src-supplier=Conrad, ComponentLink6Description=https://datasheet.ciiva.com/8021/5151-8021511.pdf?src-supplier=Element14, ComponentLink6URL=https://datasheet.ciiva.com/8021/5151-8021511.pdf?src-supplier=Element14, ComponentLink7Description=https://datasheet.ciiva.com/8021/5151-8021512.pdf?src-supplier=Element14, ComponentLink7URL=https://datasheet.ciiva.com/8021/5151-8021512.pdf?src-supplier=Element14, ComponentLink8Description=https://datasheet.ciiva.com/14122/blm-series-eng-tds-14122906.pdf?src-supplier=Distrelec, ComponentLink8URL=https://datasheet.ciiva.com/14122/blm-series-eng-tds-14122906.pdf?src-supplier=Distrelec, ComponentLink9Description=https://datasheet.ciiva.com/1012/l0110s0100blm18s-1012623.pdf?src-supplier=Digi-Key, ComponentLink9URL=https://datasheet.ciiva.com/1012/l0110s0100blm18s-1012623.pdf?src-supplier=Digi-Key, ComponentLink10Description=https://datasheet.ciiva.com/1012/l0110s0100blm18s-1012625.pdf?src-supplier=Digi-Key, ComponentLink10URL=https://datasheet.ciiva.com/1012/l0110s0100blm18s-1012625.pdf?src-supplier=Digi-Key, ComponentLink11Description=https://datasheet.ciiva.com/16395/l0110s0100blm18s-16395498.pdf?src-supplier=Future+Electronics, ComponentLink11URL=https://datasheet.ciiva.com/16395/l0110s0100blm18s-16395498.pdf?src-supplier=Future+Electronics, Core Material=Ferrite, DC Resistance-Max=25mR, Depth=0.8mm, Height=0.8mm, Impedance=120R, Item Type="Ferrite Bead", Lead Free="Lead Free", Length=1.6mm, Manufacturer Part Number=BLM18SG121TN1D, Material=Steel,Ferrite, Max Current Rating=3A, Max DC Current=3A, Number of Circuits=1, Number of Lines=1, Number of Pins=2, Packaging="Tape and Reel", Pricing 1="1=0.12640, 10=0.08350, 25=0.07210, 100=0.05150, 250=0.04730, 500=0.04110, 1000=0.03420, 3000=0.03360, 6000=0.03320, 15000=0.03270, 30000=0.03200, 75000=0.03150 (USD)", Reach SVHC Compliant=Yes, RoHS=Yes, RoHS Compliant=Yes, Series=BLM18S, Shielding=Unshielded, Stock 1=82612, Supplier 1="Arrow Electronics", Supplier Part Number 1=BLM18SG121TN1D, Termination=SMD/SMT, Test Frequency=100MHz, Width=0.8mm
J2: "250mA 1 16 Female Type-C SMD USB Connectors ROHS", LCSC Part Number=C165948, Manufacturer="Korean Hroparts Elec", ComponentLink1Description=LCSC, ComponentLink1URL=https://www.lcsc.com/product-detail/USB-Connectors_Korean-Hroparts-Elec-TYPE-C-31-M-12_C165948.html, Item Type="USB Connector", Manufacturer Part Number=TYPE-C-31-M-12
J3: library part C145963, "1x6P SH 1 1mm 6 SMD,P=1mm Wire To Board / Wire To Wire Connector ROHS", Manufacturer=BOOMELE, Package=SMD,P=1mm, ComponentLink1Description=LCSC, ComponentLink1URL=https://www.lcsc.com/product-detail/Wire-To-Board-Wire-To-Wire-Connector_BOOMELE-Boom-Precision-Elec-C145963_C145963.html, Item Type=Connector, LCSC Part Number=C145963, Manufacturer Part Number=C145963
MK1 MK2 MK3 MK4 MK5 MK6 MK7 MK8: "WINFREY MIC HI SNR/AOP BOT PORT", Manufacturer=Knowles, Operating Supply Current=285uA, Supplier Part Number 1=423-SPM0687LR5H-1CT-ND, Category=Microphones, ComponentLink1Description=https://media.digikey.com/pdf/Data%20Sheets/Knowles%20Acoustics%20PDFs/SPM0687LR5H-1.pdf?src-supplier=Digi-Key, ComponentLink1URL=https://media.digikey.com/pdf/Data%20Sheets/Knowles%20Acoustics%20PDFs/SPM0687LR5H-1.pdf?src-supplier=Digi-Key, Item Type=Microphone, Manufacturer Part Number=SPM0687LR5H-1, Output Type=Analog, Packaging="Cut Tape", Pricing 1="1=2.12000, 10=1.75900, 25=1.62560, 50=1.52880, 100=1.43540, 500=1.23212, 1000=1.17611 (USD)", RoHS=Yes, Shape=Rectangular, Stock 1=116440, Supplier 1=Digi-Key, Termination=Solder
R1 R2: library part RC0603FR-075K1L, "RES 5.1K OHM 1% 1/10W 0603", Case Code (Imperial)=0603, Case Code (Metric)=1608, LCSC Part Number=C105580, Manufacturer=Yageo, Max Operating Temperature=155°C, Max Power Dissipation=100mW, Min Operating Temperature=-55°C, Package Quantity=1, Resistance=5.1kR, Resistance Tolerance=1%, Resistor Type="Thick Film", Temperature Coefficient=100ppm/°C, Voltage Rating=50V, Case/Package=0603, Category="Chip SMD Resistors", ComponentLink1Description=https://datasheet.ciiva.com/46395/443971-46395016.pdf?src-supplier=Element14, ComponentLink1URL=https://datasheet.ciiva.com/46395/443971-46395016.pdf?src-supplier=Element14, ComponentLink2Description=https://datasheet.ciiva.com/2454/pyu-r-int-thick-7-2454046.pdf?src-supplier=Digi-Key, ComponentLink2URL=https://datasheet.ciiva.com/2454/pyu-r-int-thick-7-2454046.pdf?src-supplier=Digi-Key, ComponentLink3Description=https://datasheet.ciiva.com/2454/pyu-r-int-thick-7-2454047.pdf?src-supplier=Digi-Key, ComponentLink3URL=https://datasheet.ciiva.com/2454/pyu-r-int-thick-7-2454047.pdf?src-supplier=Digi-Key, ComponentLink4Description=https://datasheet.ciiva.com/2454/pyu-r-int-thick-7-2454045.pdf?src-supplier=Digi-Key, ComponentLink4URL=https://datasheet.ciiva.com/2454/pyu-r-int-thick-7-2454045.pdf?src-supplier=Digi-Key, ComponentLink5Description=https://datasheet.ciiva.com/15189/getdatasheetpartid-326732-15189786.pdf?src-supplier=Verical, ComponentLink5URL=https://datasheet.ciiva.com/15189/getdatasheetpartid-326732-15189786.pdf?src-supplier=Verical, Construction=Rectangular, Depth=0.8mm, Features="Moisture Resistant", Height=0.022inch, Item Type=Resistor, Lead Free="Lead Free", Length=0.063inch, Manufacturer Part Number=RC0603FR-075K1L, Military Standard=Not, Number of Pins=2, Number of Terminations=2, Packaging="Tape and Reel", Power Rating=100mW, Pricing 1="5000=0.00133, 10000=0.00131, 20000=0.00127 (USD)", Reach SVHC Compliant=Yes, RoHS=Yes, RoHS Compliant=Yes, Series=RC, Size Code=0603, Stock 1=100000, Supplier 1=Avnet, Supplier Part Number 1=RC0603FR-075K1L, Termination=SMD/SMT, Tolerance=1%, Voltage Rating (DC)=50V, Width=0.031inch
R3 R4 R5: library part CRGH0603J100K, "RES SMD 100K OHM 5% 1/5W 0603", Case Code (Imperial)=0603, Case Code (Metric)=1608, LCSC Part Number=C2074142, Manufacturer="TE Connectivity", Max Operating Temperature=125°C, Min Operating Temperature=-55°C, Number of Resistors=1, Power Rating=200mW, Resistance=100kR, Resistance Tolerance=5%, Resistor Type="Thick Film,Power resistor", Supplier Part Number 1=A126393DKR-ND, Temperature Coefficient=100ppm/°C, Voltage Rating=50V, Case/Package=0603, ComponentLink1Description=http://www.farnell.com/datasheets/2007183.pdf?src-supplier=Element14, ComponentLink1URL=http://www.farnell.com/datasheets/2007183.pdf?src-supplier=Element14, Depth=0.8mm, ELV=Compliant, Height=0.45mm, Item Type=Resistor, Length=1.6mm, Manufacturer Part Number=CRGH0603J100K, Mount="Surface Mount", Number of Terminations=2, Packaging="Tape and Reel", Pricing 1="1=0.1, 10=0.049, 100=0.02, 1000=0.00899, 2500=0.0078 (USD)", REACH SVHC="No SVHC", RoHS Compliant=Yes, Series=CRGH, Stock 1=23277, Supplier 1=Digi-Key, Technology="THICK FILM", Termination=Solder, Tolerance=5%, Voltage Rating (DC)=50V, Width=0.8mm
R6: library part RC0603JR-070RL, "RES 0 OHM JUMPER 1/10W 0603", Case Code (Imperial)=0603, Case Code (Metric)=1608, LCSC Part Number=C95177, Manufacturer=Yageo, Max Operating Temperature=155°C, Max Power Dissipation=100mW, Min Operating Temperature=-55°C, Package Quantity=5000, Resistance=0mR, Resistance Tolerance=5%, Resistor Type="Thick Film", Supplier Part Number 1=311-0.0GRCT-ND, Temperature Coefficient=200ppm/°C, Tolerance=1%, Voltage Rating=50V, Case/Package=0603, Category="Chip SMD Resistors", Construction=Rectangular, Contact Plating=Tin,Matte, Depth=0.8mm, Features="Moisture Resistant", Height=0.45mm, Item Type=Resistor, Lead Free="Lead Free", Length=1.6mm, Manufacturer Part Number=RC0603JR-070RL, Military Standard=Not, Number of Pins=2, Number of Terminations=2, Packaging="Tape and Reel", Power Rating=100mW, Pricing 1="1=0.10000, 10=0.01700, 25=0.01240, 50=0.00960, 100=0.00700, 250=0.00536, 500=0.00430, 1000=0.00316 (USD)", Radiation Hardening=No, Reach SVHC Compliant="No SVHC", RoHS=Yes, RoHS Compliant=Yes, Series=RC, Size Code=0603, Stock 1=18081776, Supplier 1=Digi-Key, Technology="THICK FILM", Termination=SMD/SMT, Voltage Rating (DC)=50V, Width=0.8mm
R7 R8: library part AC0603JR-0710KL, "RES SMD 10K OHM 5% 1/10W 0603", Case Code (Imperial)=0603, Case Code (Metric)=1608, LCSC Part Number=C140867, Manufacturer=Yageo, Max Operating Temperature=155°C, Max Power Dissipation=100mW, Min Operating Temperature=-55°C, Package Quantity=1, Resistance=10kR, Resistor Type="Thick Film", Supplier Part Number 1=1029044, Temperature Coefficient=100ppm/°C, Tolerance=5%, Voltage Rating=50V, Case/Package=0603, Category="Chip SMD Resistors", ComponentLink1Description=https://datasheet.ciiva.com/5562/pyu-ac-51-rohs-l-2-5562553.pdf?src-supplier=Mouser, ComponentLink1URL=https://datasheet.ciiva.com/5562/pyu-ac-51-rohs-l-2-5562553.pdf?src-supplier=Mouser, Construction=Rectangular, Depth=0.8mm, Features="Moisture Resistant,Automotive AEC-Q200,Anti-Sulfur", Height=0.022inch, Item Type=Resistor, Lead Free="Lead Free", Length=0.063inch, Manufacturer Part Number=AC0603JR-0710KL, Military Standard=Not, Number of Terminations=2, Packaging="Tape and Reel", Power Rating=100mW, Pricing 1="5000=0.00540 (USD)", RoHS=Yes, RoHS Compliant=Yes, Series=AC, Size Code=0603, Stock 1=1533000, Supplier 1="Future Electronics", Termination=SMD/SMT, Width=0.031inch
SW1: "3mm 2mm Round Button 50mA Top3.65mm SPST 12V SMD Tactile Switches", Manufacturer=XKB, Package=Custom, ComponentLink1Description=LCSC, ComponentLink1URL=https://lcsc.com/product-detail/Tactile-Switches_XKB-Connectivity-TS-1185EC-C-D-B_C318893.html, Manufacturer Part No=TS-1185EC-C-D-B
SW2: "50mA Lying 100MΩ 100000 Times 250gf@±30gf 12V Plugin Tactile Switches ROHS", LCSC Part Number=C502329, Manufacturer="Korean Hroparts Elec", Package=Plugin, ComponentLink1Description=LCSC, ComponentLink1URL=https://www.lcsc.com/product-detail/Tactile-Switches_Korean-Hroparts-Elec-K2-1101DF-C4DW-01_C502329.html, Item Type="Tactile Switch", Manufacturer Part Number=K2-1101DF-C4DW-01
U1: "Linear Voltage Regulator IC Positive Fixed 1 Output 3.3V 1A SOT-25", Case/Package=SOT-25, Dropout Voltage=655mV, LCSC Part Number=C86534, Manufacturer=Torex, Max Input Voltage=6V, Max Operating Temperature=85°C, Min Current Limit=1.005A, Min Input Voltage=1.6V, Min Operating Temperature=-40°C, Nominal Output Voltage=3.3V, Output Current=1A, Package Quantity=1, Supplier Part Number 1=84R0738, Category="Voltage Regulators - Linear", ComponentLink1Description=https://datasheet.ciiva.com/7992/610888-7992813.pdf?src-supplier=Element14, ComponentLink1URL=https://datasheet.ciiva.com/7992/610888-7992813.pdf?src-supplier=Element14, ComponentLink2Description=https://datasheet.ciiva.com/5755/610888-5755886.pdf?src-supplier=Farnell, ComponentLink2URL=https://datasheet.ciiva.com/5755/610888-5755886.pdf?src-supplier=Farnell, ComponentLink3Description=https://datasheet.ciiva.com/2040/xc6220-2040201.pdf?src-supplier=Digi-Key, ComponentLink3URL=https://datasheet.ciiva.com/2040/xc6220-2040201.pdf?src-supplier=Digi-Key, ComponentLink4Description=https://datasheet.ciiva.com/2040/xc6220-2040200.pdf?src-supplier=Digi-Key, ComponentLink4URL=https://datasheet.ciiva.com/2040/xc6220-2040200.pdf?src-supplier=Digi-Key, ComponentLink5Description=https://datasheet.ciiva.com/2040/xc6220-2040202.pdf?src-supplier=Digi-Key, ComponentLink5URL=https://datasheet.ciiva.com/2040/xc6220-2040202.pdf?src-supplier=Digi-Key, Item Type=IC, Manufacturer Part Number=XC6220B331MR-G, Mount="Surface Mount", Number of Pins=5, Number of Regulators=1, Output Type=Fixed, Output Voltage=3.3V, Packaging="Tape and Reel", Pricing 1="1=1.20000, 10=1.08000, 100=0.83900, 500=0.69300, 1000=0.54800 (USD)", REACH SVHC="No SVHC", RoHS=Yes, RoHS Compliant=Yes, Series=-, Stock 1=3078, Supplier 1=Newark
U2: "IC ADC 24BIT SIGMA-DELTA 32TQFP", Manufacturer="Texas Instruments", Supplier Part Number 1=595-ADS131M08IPBSR, Category="Analog to Digital Converters (ADCs)", Manufacturer Part Number=ADS131M08IPBSR, Pricing 1="1=8.85000, 10=7.99000, 50=7.62000, 100=6.62000, 1000=5.39000, 10000=5.39000 (USD)", RoHS=Yes, Supplier 1=Mouser
U3: "SMD,18x25.5mm WiFi Modules ROHS", LCSC Part Number=C2913204, Manufacturer="Espressif Systems", Supplier Part Number 1=1965-ESP32-S3-WROOM-1-N8R2-ND, Category=Uncategorized, ComponentLink1Description=LCSC, ComponentLink1URL=https://www.lcsc.com/product-detail/WiFi-Modules_Espressif-Systems-ESP32-S3-WROOM-1-N8R2_C2913204.html, Item Type=Module, Manufacturer Part Number=ESP32-S3-WROOM-1-N8R2, RoHS=No, Supplier 1=Digi-Key
X1: "8.192MHz SMD Crystal Resonator 12pF 150Ω ±10ppm ±30ppm -40℃~+85℃ SMD_3225_4P Crystals ROHS", Manufacturer=JYJE, Package=Custom, Manufacturer Part No=3TJ481920NYLBC

## Free pads (board coordinates)
  round 196.85 hole 118.11: MH1(2.69,1647.06) MH2(0,0) MH3(1808,3.15) MH4(1810.69,1643.91)
  round 0 hole 236.22: MH4(265.22,240.79) MH4(1545.47,1403.12)

## Via types
v1: diameter 23.62, hole 11.81, Top Layer to Bottom Layer, 84 vias

## Nets (pads, with @x,y where several pads share a name; then routed paths per layer and width w, separated by ;. In a path a pad name is that pad's centre, name@x,y a point inside that pad or via, vN(x,y) a via of type N, cw(c..) or ccw(c..) an arc to the next point about the centre after c; other vN are vias at no path point)
3V3: C2.1 C3.1 C4.1 C5.1 C6.1 C7.1 C8.1 C9.1 C10.1 C11.1 C12.1 C13.1 C14.1 C15.1 C16.1 C17.1 C18.1 C35.1 C36.1 C37.1 C38.1 C43.1 C44.1 D2.1 FB2.2 J3.1 MK1.5 MK2.5 MK3.5 MK4.5 MK5.5 MK6.5 MK7.5 MK8.5 R3.2 R4.2 R5.2 R7.1 R8.2 U2.15 U2.26 U3.2 | length 9734.6
  Top Layer w10: C3.1@-156.51,1055.04 C3.1@-156.51,1057.28 -153.63,1064.23 -142.93,1097.18 C4.1@-140.51,1104.28 C4.1@-138.37,1111.47 ; FB2.2@37,706.56 FB2.2@40.94,706.56 ; 237.68,1655.24 238.19,1656.55 ; D2.1@478.28,1885 D2.1@483,1880.28 ; C37.1@695,660 726.16,660 746.4,639.76 U2.26@797.64,639.76 ; U2.15@1041.73,639.76 1105.14,639.76 1111,645.62 C38.1@1111,673
  Top Layer w15: C2.1@-6,706 C2.1@-4,708 ; FB2.2@36.44,703 FB2.2@37,703.56
  Top Layer w20: R8.2@-223,547 -220.5,547 -215.5,542 -215.5,539.5 -121,445 25,445 75,495 75,672.5 FB2.2@40.94,706.56 ; R7.1@-20.02,1478 -18.77,1479.25 141.25,1479.25 219.21,1557.21 219.21,1599.62 230.53,1610.94 ; C43.1@483,1775 C44.1@483,1825 D2.1@483,1880.28 ; C38.1@1111,673 1111,704.5 1156.5,750 1156.5,768
  Top Layer w25: C37.1@695,660 v1(695,690) C35.1@695,720
  Top Layer w30: C44.1@485.5,1825 U3.2@561.02,1825 v1(626,1825)
  Top Layer w50: 1174,785.5 1174,854 1402,1082 1704.09,1082 1860.18,1238.08 ; 1848.35,1275.64 1848.78,1275.21
  Top Layer w60: v1(-111.1,1078) -19.15,1078 16,1042.85 v1(16,744) 16,725.25 ; 1879.82,458.32 1879.82,785.79 2046.78,952.76
  Bottom Layer w60: v1@-111.1,1076 v1(-111.1,1078) -111.1,1272.31 v1(220.53,1603.94) 441.58,1825 v1(626,1825) 1315.31,1825 v1(1370.31,1770) ; v1(513,-125) 358,-125 10,223 v1(10,250) 10,738 v1(16,744) 144,872 638,872 695,815 v1(695,690) 695,549 767,477 1078,477 1139,538 v1(1139,717) ; v1(1436.63,-60.95) 1436.63,350.63 1562,476 1731.37,476 1732.37,475 v1(1884,475) ; v1(1822,1309) 1822,1139 1916,1045 v1(2076,1045)
5V: C1.1 C47.1 FB1.2 U1.1 U1.3 | length 144.4
  Top Layer w15: U1.1@-58.98,605 U1.1@-57.99,605.98
  Top Layer w30: -11,509 -11,652
\C\S\: R4.1 U2.17 U3.21 | length 1006.8
  Top Layer w10: v1(951,611) 988.58,648.58 U2.17@988.58,712.6 988.58,758.58 1040,810 R4.1@1065,810
  Top Layer w20: U3.21@930.71,1175.79 U3.21@930.85,1175.93 ; v1@930.85,1219.85 v1(931,1220)
  Top Layer w30: U3.21@930.85,1175.93 v1@930.85,1219.85
  Bottom Layer w20: v1(931,1220) 976,1220 1021,1175 1021,681 v1(951,611)
\D\R\D\Y\: R5.1 U2.18 U3.17 | length 1551.2
  Top Layer w10: U2.18@968.9,712.6 968.9,763.9 R5.1@1065,860 1065,862.5 1075,872.5 1077.5,872.5 1087.73,882.73 v1(1087.73,907)
  Top Layer w30: v1(730.71,1130.71) U3.17@730.71,1175.79
  Bottom Layer w20: v1(730.71,1130.71) 748,1113.42 748,583 792,539 1054,539 1087.73,572.73 v1(1087.73,907)
\R\E\S\E\T\: R3.1 U2.16 U3.18 | length 1081.8
  Top Layer w10: U2.16@1053.1,659.45 U2.16@1041.73,659.45 1041.73,711.33 1055,724.6 v1(1055,728) v1@1055,731.69
  Top Layer w30: v1(780.71,1130.71) U3.18@780.71,1175.79
  Bottom Layer w20: v1@780.71,1129.73 780.71,609.29 814,576 1033,576 1055,598 v1(1055,728)
ADC1_XIN: R6.1 U2.22 | length 246.2
  Top Layer w10: U2.22@890.16,712.6 890.16,775.75 914.41,800 972.68,800 1010,837.32 R6.1@1010,875
ADC1_XOUT#: C40.2 U2.23 X1.3 | length 253.1
  Top Layer w10: X1.3@793.98,875 X1.3@803.39,865.59 808.39,860.59 808.39,820 870.47,757.91 U2.23@870.47,712.6
  Top Layer w20: C40.2@735,875 X1.3@793.98,875
CAP: C42.2 U2.24 | length 142.1
  Top Layer w10: C42.2@770,790 770,740 797.4,712.6 U2.24@850.79,712.6
"DEBUG SIG.ENABLE": C48.2 C53.1 J3.6 R7.2 SW1.1 U3.3 | length 3354
  Top Layer w20: -163,1372 -155.95,1364.95 -155.95,1326.86 -140.09,1311 v1(11,1311) ; C48.2@485.5,1642.72 v1(485.5,1668.11) ; J3.6@2078.28,728.35 v1(2142.26,728.35)
  Top Layer w30: U3.3@561.02,1775 621,1775 v1(639,1757)
  Bottom Layer w20: v1(11,1311) 368.11,1668.11 v1(485.5,1668.11) 603.1,1668.11 ; v1@638,1756 v1(639,1757) 639,1704.01 603.1,1668.11 ; v1(2142.26,728.35) 2142.26,765.74 2038,870 1711,870 1262,1319 1262,1595.68 1189.57,1668.11 603.1,1668.11
"DEBUG SIG.IO_0": J3.5 U3.27 | length 1018.6
  Top Layer w10: U3.27@1250,1225 U3.27@1250.41,1225.41
  Top Layer w15: v1@2024.08,767.64 J3.5@2078.2,767.64
  Top Layer w20: U3.27@1250,1225 v1(1301,1225) ; v1(2024,767.56) v1@2024.08,767.64 ; J3.5@2078.2,767.64 J3.5@2078.28,767.72 J3.5@2078.44,767.56
  Bottom Layer w20: v1(1301,1225) 1758.44,767.56 v1(2024,767.56)
"DEBUG SIG.RX": J3.4 U3.36 | length 1579.8
  Top Layer w10: J3.4@2078.32,807.04 J3.4@2078.28,807.09
  Top Layer w15: J3.4@2078.32,807.04 2078.82,806.54 2168.46,806.54 v1(2169,806)
  Top Layer w20: U3.36@1250,1675 v1(1298,1675)
  Bottom Layer w20: v1(1298,1675) 1298,1341 1703,936 2063,936 2168.31,830.69 2168.31,806.69 v1(2169,806)
"DEBUG SIG.TX": J3.3 U3.37 | length 1658.8